# Altium PCB PIC18F16Q20_Curiosity_Nano.PcbDoc (part 2 of 2)
Units mm, origin at the board's own origin, x right, y up, seen from the top; angles counter-clockwise.
Board outline 50.8 x 20.32 mm, 4 copper layers (Top Layer, Gnd Plane, Pwr Plane, Bottom Layer), stack 1.574 mm thick; 77 components, 73 nets, 345 pads, 157 vias.
Unrouted connection lines stored in the file: 1.
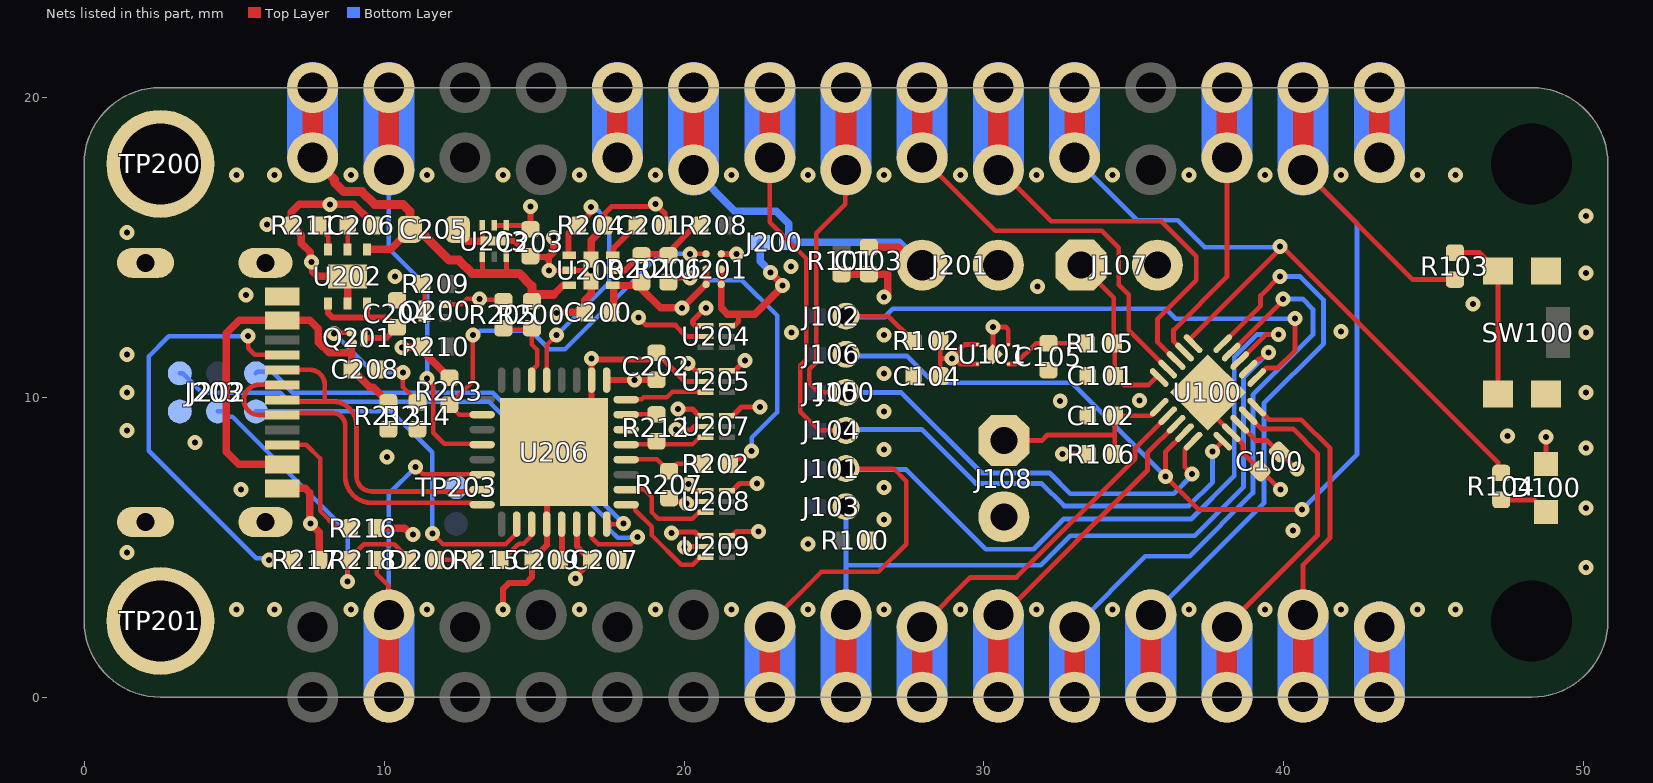
[diagram p4: the nets of this part, all layers, seen from the top]

## Via types
v1: diameter 0.5, hole 0.2, Top Layer to Bottom Layer, 147 vias
v2: diameter 0.5, hole 0.2, Top Layer to Bottom Layer, tented both sides, 8 vias
v3: diameter 0.5, hole 0.2, Top Layer to Bottom Layer, tented top, 2 vias

## Nets (pads, with @x,y where several pads share a name; then routed paths per layer and width w, separated by ;. In a path a pad name is that pad's centre, name@x,y a point inside that pad or via, vN(x,y) a via of type N, cw(c..) or ccw(c..) an arc to the next point about the centre after c; other vN are vias at no path point) (continued)
GND: C100.2 C101.2 C102.2 C103.1 C104.1 C105.1 C200.1 C201.2 C202.1 C203.1 C204.1 C205.1 C206.1 C207.2 C209.1 J100.15 J100.16 J100.26 J107.2 J108.2 J202.2 J203.1 J203.2 J203.3 J203.4 J203.A1/B12 J203.B1/A12 Q200.2 R100.2 R101.2 R203.2 R204.2 R205.1 R206.1 R207.1 R210.2 R211.2 R213.2 R214.2 R216.2 R217.2 SW100.1 SW100.2 TP200.1 TP201.1 TP203.1 U100.17 U100.21 U101.2 U101.5 U200.2 U200.7 U201.C1 U202.5 U202.7 U203.3 U203.7 U204.2 U205.2 U206.10 U206.28 U206.33 U207.2 U208.2 U209.2 | length 60
  Top Layer w0.15: Q200.2@12.04,13.1 12.575,13.1 12.75,13.275 v1(13.19,13.275) 13.215,13.25 R205.1@13.979,13.25
  Top Layer w0.16: U101.5@30.297,11.433 v1@30.297,12.325 ; v1(30.306,12.342) 30.717,12.342 30.81,12.248 U101.2@30.81,11.758 ; U100.21@37.465,10.16 37.465,9.594 38.63,8.429 38.63,8.154 39.86,6.924 v1(39.889,6.924)
  Top Layer w0.166: v1(18.48,12.65) 18.73,12.4 19.71,12.4 20.085,12.025 U204.2@20.729,12.025 ; C202.1@19.058,11.5 20.033,10.525 U205.2@20.729,10.525 ; v1(19.734,8.925) 19.759,8.9 19.804,8.9 20.217,8.9 20.343,9.025 U207.2@20.729,9.025 ; v1@20.13,5.025 U209.2@20.729,5.025 ; v1@20.155,6.525 U208.2@20.729,6.525
  Top Layer w0.175: U203.3@13.279,15.725 13.279,15.2 U203.7@13.679,15.2 ; v1(15.505,14.225) U200.2@16.18,14.225 v1(16.905,14.225) ; R204.2@17.355,15.725 17.355,16.122 17.59,16.357 18.89,16.357 18.969,16.436 v1(19.057,16.436) 19.355,16.138 C201.2@19.355,15.725 ; R206.1@19.48,13.775 19.68,13.975 v1(20.199,13.975) ; R207.1@19.555,6.525 19.559,6.521 19.861,6.521 19.932,6.45 v1(20.08,6.45) v1@20.155,6.525 ; v1(20.023,4.998) 20.103,4.998 v1@20.13,5.025 ; v1@20.089,5.025 v1@20.13,5.025 ; v1@20.125,5.02 v1@20.13,5.025
  Top Layer w0.2: U203.7@13.679,15.2 14.354,15.2 14.879,14.675 15.38,14.675 15.505,14.55 ; v1(13.97,2.921) 13.97,3.615 14.155,3.8 14.732,3.8 14.93,3.998 14.93,4.575 15.424,5.069 15.424,7.909 U206.33@15.679,8.164 ; v1(15.505,14.225) 15.505,14.55 ; 15.505,14.705 15.505,14.55 ; U206.33@15.689,8.174 16.916,9.401 16.916,11.112 17.063,11.259 18.817,11.259 C202.1@19.058,11.5 ; U201.C1@21.242,14.775 v1(21.755,14.775)
  Top Layer w0.25: J203.A1/B12@6.39,13.36 J203.A1/B12@6.665,13.36 ; J203.B1/A12@6.665,6.96 7.368,6.96 7.515,6.814 7.515,5.821 7.844,5.493 R217.2@7.844,4.575 ; U202.5@8.785,13.128 U202.7@8.785,14.028 7.784,14.028 7.627,14.186 7.627,14.452 7.535,14.544 7.535,14.84 7.246,15.128 7.246,15.393 7.081,15.558 7.062,15.558 6.913,15.707 6.913,16.168 7.172,16.426 v1(8.19,16.426) 8.192,16.424 8.986,16.424 9.518,15.892 9.536,15.892 9.685,15.743 C206.1@9.685,15.725 ; R216.2@9.752,5.633 10.684,5.633 10.892,5.425 v2(10.96,5.425) ; v1(10.599,11.649) 10.617,11.667 11.248,11.667 R210.2@11.265,11.684 11.407,11.542 11.407,11.412 12.008,10.811 12.008,10.793 12.157,10.644 R203.2@12.175,10.644 ; C205.1@12.356,15.597 12.754,15.2 U203.7@13.279,15.2 ; 15.505,14.705 15.655,14.855 v1(15.655,15.325) ; v1(15.755,12.8) 15.782,12.827 C200.1@16.695,12.827 16.695,13.233 16.905,13.443 v1(16.905,14.225) 16.905,15.225 R204.2@17.405,15.725 ; R101.2@25.248,14.104 C103.1@26.162,14.104 26.794,14.104 26.794,13.459 v1(26.67,13.335)
  other v1: 5.08,2.921 6.35,2.921 8.89,2.921 11.43,2.921 16.51,2.921 19.05,2.921 21.59,2.921 24.13,2.921 26.67,2.921 29.21,2.921 31.75,2.921 34.29,2.921 36.83,2.921 39.37,2.921 41.91,2.921 44.45,2.921 45.72,2.921 50.065,4.321 1.429,4.826 24.141,5.102 40.304,5.559 7.544,5.792 26.67,5.915 50.065,6.306 26.67,6.985 26.67,8.255 50.065,8.3 47.45,8.701 1.429,8.89 26.67,9.525 32.543,9.871 35.179,9.882 1.429,10.16 50.065,10.15 26.67,10.795 16.913,11.284 1.429,11.43 26.67,12.065 23.58,12.152 50.065,12.15 41.9,12.192 46.3,13.113 5.39,13.413 31.78,13.694 10.366,14.025 50.065,14.133 23.565,14.353 7.579,14.5 1.429,15.494 6.1,15.755 50.065,16.045 5.08,17.399 6.35,17.399 8.89,17.399 11.43,17.399 13.97,17.399 16.51,17.399 19.05,17.399 21.59,17.399 24.13,17.399 26.67,17.399 29.21,17.399 31.75,17.399 34.29,17.399 36.83,17.399 39.37,17.399 41.91,17.399 44.45,17.399 45.72,17.399
  other v2: 5.235,6.924 10.093,8.006 3.701,8.493
ID_SYS: J100.2 R218.1 U206.22 | length 9.6
  Top Layer w0.15: R218.1@9.748,4.513 9.748,4.114 10.16,3.703 J100.2@10.16,2.743 ; v1(11.055,7.675) 11.306,7.424 U206.22@13.28,7.424
  Bottom Layer w0.15: J100.2@10.16,2.743 10.16,6.78 v1(11.055,7.675)
NetC201_1: C201.1 U200.6 | length 1.3
  Top Layer w0.2: U200.6@17.655,14.725 17.655,14.975 C201.1@18.405,15.725
NetC206_2: C206.2 U202.2 | length 0.8
  Top Layer w0.15: U202.2@8.785,14.899 C206.2@8.785,15.725
NetC208_1: C208.1 Q201.1 R214.1 | length 5.5
  Top Layer w0.15: v2(8.338,12.122) 8.366,12.15 Q201.1@8.927,12.15 ; C208.1@9.818,10.931 10.431,10.931 10.536,10.825 v2(10.631,10.825) 10.631,10.339 R214.1@11.145,9.825
  Bottom Layer w0.15: v2(8.338,12.122) 9.635,10.825 v2(10.631,10.825)
NetD100_2: D100.2 R104.2 | length 1.7
  Top Layer w0.16: R104.2@47.244,6.573 48.342,6.573 D100.2@48.74,6.175
NetD200_2: D200.2 R215.1 | length 1.3
  Top Layer w0.15: D200.2@11.715,4.575 R215.1@12.98,4.575
NetJ203_A5: J203.A5 R217.1 | length 14.7
  Top Layer w0.15: v2(5.468,12.035) 5.468,11.634 5.691,11.41 J203.A5@6.665,11.41 ; v2(6.165,4.575) R217.1@6.944,4.575
  Bottom Layer w0.15: v2(5.468,12.035) 2.827,12.035 2.15,11.358 2.15,8.219 5.737,4.632 6.108,4.632 v2(6.165,4.575)
NetJ203_B5: J203.B5 R216.1 | length 4.4
  Top Layer w0.15: J203.B5@6.665,8.41 7.411,8.41 7.865,7.956 7.865,6.208 8.44,5.633 R216.1@8.852,5.633
NetQ200_3: Q200.3 R209.1 | length 1
  Top Layer w0.15: R209.1@11.214,13.7 11.355,13.559 Q200.3@11.355,12.8
NetR103_2: R103.2 SW100.3 SW100.4 | length 5.8
  Top Layer w0.16: R103.2@45.7,14.821 46.519,14.821 46.72,14.62 46.72,14.57 47.09,14.2 SW100.4@47.14,14.2 SW100.3@47.14,10.1
NetR211_1: R211.1 U202.3 | length 0.9
  Top Layer w0.15: R211.1@7.813,15.725 7.813,15.666 8.135,15.344 U202.3@8.135,14.912
RA0_ANA0_ICSPDAT: J100.24 J104.2 U100.16 | length 26
  Top Layer w0.15: J100.24@22.86,17.983 22.86,15.836 24.075,14.621 24.075,11.251 23.88,11.056 23.88,9.518 24.508,8.89 J104.2@25.4,8.89
  Top Layer w0.16: v1(37.619,8.193) U100.16@37.96,8.534
  Bottom Layer w0.16: J104.2@25.4,8.89 25.434,8.924 27.921,8.924 29.72,7.125 31.917,7.125 32.669,6.373 34.816,6.373 34.82,6.377 36.83,6.377 37.619,7.166 v1(37.619,8.193)
RA1_ANA1_ICSPCLK: J100.23 J105.2 U100.15 | length 23.5
  Top Layer w0.15: J105.2@25.4,10.16 24.487,10.16 24.18,10.467 24.18,10.932 24.403,11.155 24.403,15.463 25.375,16.434 25.375,17.551 J100.23@25.4,17.577
  Top Layer w0.16: v1(36.935,7.432) 36.692,7.675 36.692,8.256 U100.15@36.97,8.534
  Bottom Layer w0.16: J105.2@25.4,10.16 25.407,10.153 27.24,10.153 29.921,7.472 32.19,7.472 32.881,6.781 34.034,6.781 36.321,6.781 36.935,7.395 v1(36.935,7.432)
RA2_ANA2_DBG2_SW0_INT0: J100.17 J106.2 R103.1 U100.14 | length 38.5
  Top Layer w0.16: v1(36.048,7.359) 37.147,6.26 v1(40.604,6.26) ; v1@36.051,7.359 36.051,8.18 U100.14@36.687,8.816 ; J100.17@40.64,17.577 44.296,13.921 R103.1@45.7,13.921
  Bottom Layer w0.16: J106.2@25.4,11.43 25.455,11.375 27.432,11.375 28.328,10.478 32.929,10.478 v1(36.048,7.359) ; v1(40.604,6.26) 42.436,8.092 42.436,15.78 J100.17@40.64,17.577
RA3_M\C\L\R\: J102.2 R102.1 U100.1 | length 20.5
  Top Layer w0.16: J102.2@25.4,12.7 26.814,12.7 R102.1@27.639,11.875 ; U100.1@39.091,10.655 39.409,10.972 39.798,10.972 40.373,11.547 v1(40.373,12.616)
  Bottom Layer w0.16: J102.2@25.4,12.7 25.431,12.669 26.683,12.669 26.964,12.95 36.052,12.95 36.387,12.616 v1(40.373,12.616)
RA4_SPI_SS: J100.14 U100.20 | length 8.9
  Top Layer w0.16: U100.20@39.091,9.665 39.506,9.25 40.579,9.25 41.537,8.293 41.537,5.309 40.64,4.413 J100.14@40.64,2.743
RA5_SPI_SCK: J100.13 U100.19 | length 9.9
  Top Layer w0.16: J100.13@38.1,2.337 38.1,2.371 41.117,5.389 41.117,8.127 40.304,8.94 39.251,8.94 U100.19@38.809,9.382
RB5_I3C2_SDA: J100.22 U100.9 | length 12.5
  Top Layer w0.16: J100.22@27.94,17.983 30.377,15.546 33.926,15.546 34.496,14.977 34.496,13.742 34.829,13.409 34.829,12.23 U100.9@36.121,10.938
RB6_I3C2_SCL: J100.21 U100.8 | length 12.1
  Top Layer w0.16: J100.21@30.48,17.577 30.527,17.577 32.237,15.867 35.91,15.867 37.077,14.7 37.077,13.898 35.782,12.602 35.782,11.843 U100.8@36.404,11.221
RB7_ANB7: J100.18 U100.7 | length 7.4
  Top Layer w0.16: U100.7@36.687,11.504 36.323,11.868 36.323,12.238 38.1,14.015 J100.18@38.1,18
RC0_I2C_I3C1_SCL: J100.10 U100.13 | length 8.9
  Top Layer w0.16: J100.10@30.48,2.743 30.637,2.743 35.45,7.556 35.45,8.145 U100.13@36.404,9.099
RC1_I2C_I3C1_SDA: J100.9 U100.12 | length 11.3
  Top Layer w0.16: J100.9@27.94,2.337 27.94,2.385 29.548,3.993 31.082,3.993 35.039,7.95 35.039,8.299 U100.12@36.121,9.382
RC3_SPI_MOSI: J100.11 U100.4 | length 18.4
  Top Layer w0.16: U100.4@38.243,11.504 39.976,13.237 v1(39.976,13.274)
  Bottom Layer w0.16: J100.11@33.02,2.337 35.379,4.696 36.854,4.696 38.966,6.807 38.966,10.08 40.965,12.08 40.965,12.932 40.623,13.274 v1(39.976,13.274)
RC4_UART_TX: J100.7 J101.2 U100.3 | length 32.5
  Top Layer w0.15: J100.7@22.86,2.337 22.86,2.461 24.572,4.173 26.479,4.173 27.404,5.099 27.404,7.202 26.986,7.62 J101.2@25.4,7.62 J101.2@25.41,7.61
  Top Layer w0.16: U100.3@38.526,11.221 39.394,12.089 v1(39.817,12.089)
  Bottom Layer w0.16: J101.2@25.4,7.62 25.427,7.593 27.399,7.593 30.059,4.932 31.65,4.932 32.657,5.939 36.911,5.939 38.346,7.374 38.346,11.337 39.097,12.089 v1(39.817,12.089)
RC5_UART_RX: J100.8 J103.2 U100.2 | length 23.7
  Top Layer w0.16: U100.2@38.809,10.938 39.154,11.284 39.234,11.284 39.444,11.494 v1(39.491,11.494)
  Bottom Layer w0.16: J100.8@25.4,2.743 25.4,4.4 ; J103.2@25.4,6.35 25.4,4.4 ; v1(39.491,11.494) 38.656,10.659 38.656,7.01 37.028,5.383 32.874,5.383 31.891,4.4 25.4,4.4
RC6_SPI_MISO: J100.12 U100.5 | length 17.7
  Top Layer w0.16: U100.5@37.96,11.786 39.222,13.048 39.222,13.385 v1(39.864,14.028)
  Bottom Layer w0.16: J100.12@35.56,2.743 35.606,2.743 39.332,6.469 39.332,9.793 41.323,11.784 41.323,13.236 40.531,14.028 v1(39.864,14.028)
RC7_ANC7_LED0_PWM: J100.20 R104.1 U100.6 | length 23.3
  Top Layer w0.16: U100.6@36.97,11.786 36.856,11.9 36.856,11.926 39.876,14.946 v1(39.876,15.02) 39.943,15.02 47.135,7.828 47.135,7.582 R104.1@47.244,7.473
  Bottom Layer w0.16: J100.20@33.02,17.983 35.106,15.897 36.457,15.897 37.354,15 39.856,15 v1(39.876,15.02)
REG_ADJUST: R201.2 R206.2 R208.1 U200.5 | length 3.4
  Top Layer w0.2: U200.5@17.655,14.225 18.03,14.225 18.58,14.775 19.505,14.775 19.505,14.85 R208.1@20.38,15.725
REG_ENABLE: R204.1 U200.1 U206.13 | length 8.9
  Top Layer w0.15: U206.13@15.416,10.556 15.416,11.736 v1(15.755,12.075)
  Top Layer w0.2: U200.1@16.155,14.725 16.155,15.475 16.405,15.725 R204.1@16.373,15.725 ; R204.1@16.455,15.725 16.455,15.73 16.65,15.925 16.655,15.925 16.848,16.118 16.848,16.275 v1(16.905,16.333)
  Bottom Layer w0.15: v1(15.755,12.075) 17.506,13.826 17.506,15.853 17.151,16.207 17.125,16.207 17,16.333 v1(16.905,16.333)
RESERVED: U206.6
S0_0_RX: R212.1 U206.5 U207.3 | length 2.8
  Top Layer w0.15: U206.5@18.06,8.424 20.28,8.424 20.531,8.675 U207.3@20.729,8.675
S0_2_TX: R212.2 U206.7 | length 1
  Top Layer w0.15: U206.7@18.06,9.424 R212.2@19.055,9.424
S0_3_CLK: U205.3 U206.8 | length 2.8
  Top Layer w0.15: U206.8@18.06,9.937 18.595,9.937 18.659,10 19.43,10 19.605,10.175 U205.3@20.729,10.175
S1_0_TX: U206.1 U209.3 | length 3.9
  Top Layer w0.15: U206.1@18.07,6.42 18.33,6.42 18.376,6.374 18.376,6.231 18.93,5.677 18.93,5.389 19.906,4.413 20.291,4.413 20.554,4.675 U209.3@20.729,4.675
S1_1_RX: U206.2 U208.3 | length 3.5
  Top Layer w0.15: U206.2@18.06,6.924 18.666,6.924 18.93,6.66 18.93,6.156 19.136,5.95 20.28,5.95 20.505,6.175 U208.3@20.729,6.175
S\R\S\T\: J202.6 U206.26 | length 12.5
  Top Layer w0.15: v3(11.609,5.458) 11.967,5.1 13.102,5.1 14.05,5.1 14.465,5.515 14.465,5.55 14.47,5.555 U206.26@14.47,5.695
  Bottom Layer w0.15: J202.6@5.73,9.525 10.245,9.524 11.609,8.16 v3(11.609,5.458)
STATUS_LED: R215.2 U206.27 | length 1.7
  Top Layer w0.15: R215.2@13.93,4.575 13.955,4.575 14.455,5.075 14.5,5.12 14.66,5.12 14.765,5.225 14.933,5.393 U206.27@14.933,5.777
SWCLK: J202.1 U206.31 | length 19.9
  Top Layer w0.15: U206.31@16.924,5.787 16.924,5.316 17.14,5.1 18.224,5.1 v1(18.455,5.331)
  Bottom Layer w0.15: J202.1@3.19,10.795 3.285,10.795 3.93,10.15 6.536,10.15 6.833,9.853 13.496,9.853 17.514,5.835 17.514,5.587 17.792,5.309 18.433,5.309 v1(18.455,5.331)
SWDIO: J202.5 U206.32 | length 14.9
  Top Layer w0.15: U206.32@17.42,5.77 17.975,5.77 v1(17.989,5.784)
  Bottom Layer w0.15: J202.5@5.73,10.795 5.778,10.843 6.267,10.843 6.958,10.153 13.62,10.153 v1(17.989,5.784)
USBD_N: J203.A7 J203.B7 U206.23 | length 13
  Top Layer w0.16: J203.B7@6.665,10.91 6.669,10.914 7.523,10.914 ; U206.23@13.27,6.92 12.946,6.92 12.886,6.86 9.59,6.86 ; J203.A7@6.725,9.85 cw(c6.725,9.91) 6.665,9.91 ccw(c6.725,9.91) J203.A7@6.725,9.85 ; J203.A7@6.725,9.85 8.025,9.85 ; 7.522,10.914 cw(c7.522,10.414) 8.022,10.414 ; 7.522,10.914 cw(c7.522,10.414) 8.022,10.414 ; 8.022,10.414 8.022,9.852 8.025,9.85 ; 8.025,9.85 8.296,9.85 cw(c8.296,9.063) 9.083,9.063 9.083,7.366 ; 9.083,7.366 ccw(c9.59,7.366) 9.59,6.86 ; 9.083,7.366 ccw(c9.59,7.366) 9.59,6.86
USBD_P: J203.A6 J203.B6 U206.24 | length 15.3
  Top Layer w0.16: 5.327,9.912 cw(c5.827,9.912) 5.827,10.412 J203.A6@6.665,10.412 ; U206.24@13.27,6.42 12.946,6.42 12.886,6.48 9.59,6.48 ; 5.827,9.408 cw(c5.827,9.908) 5.327,9.908 ccw(c5.827,9.908) 5.827,9.408 ; 5.827,9.408 6.665,9.408 J203.B6@6.665,9.41 ; J203.B6@6.665,9.41 cw(c6.725,9.41) J203.B6@6.725,9.47 ; J203.B6@6.665,9.41 cw(c6.725,9.41) J203.B6@6.725,9.47 ; J203.B6@6.725,9.47 8.296,9.47 ; 8.296,9.47 cw(c8.296,9.063) 8.703,9.063 ; 8.296,9.47 cw(c8.296,9.063) 8.703,9.063 ; 8.703,7.366 ccw(c9.59,7.366) 9.59,6.48 ; 8.703,7.366 ccw(c9.59,7.366) 9.59,6.48 ; 8.703,7.366 8.703,9.063
V\O\F\F\: J100.29 U206.20 | length 11.2
  Top Layer w0.15: v1(11.433,10.628) 11.433,10.573 11.635,10.371 11.635,8.815 12.003,8.447 12.873,8.447 12.88,8.439 13.251,8.439 U206.20@13.27,8.42
  Bottom Layer w0.15: J100.29@10.16,17.577 10.16,14.958 11.433,13.686 v1(11.433,10.628)
VBUS: C208.2 J203.A4/B9 J203.B4/A9 Q201.2 R213.1 | length 13.6
  Top Layer w0.2: 8.927,11.475 Q201.2@8.927,11.715
  Top Layer w0.25: J203.B4/A9@6.675,7.76 6.665,7.76 5.16,7.76 4.74,8.18 4.74,12.131 5.169,12.56 6.665,12.56 7.528,12.56 7.813,12.275 7.813,11.832 8.171,11.475 8.927,11.475 C208.2@8.927,10.94 ; C208.2@8.918,10.931 8.918,10.912 9.067,10.763 9.085,10.763 9.523,10.325 9.644,10.325 9.976,9.992 9.976,9.974 10.121,9.829 R213.1@10.139,9.829
VBUS_ADC: R200.2 R205.2 U206.14 | length 2.8
  Top Layer w0.15: R205.2@13.979,12.25 14.916,12.25 14.916,11.764 15.105,11.575 15.105,11.068 14.916,10.879 U206.14@14.916,10.556
VBUS_DELAYED: C204.2 Q201.3 U202.4 U202.6 | length 4.5
  Top Layer w0.2: U202.4@8.135,13.128 8.135,13.054 8.135,12.803 8.286,12.652 10.108,12.652 10.266,12.494 10.266,12.476 C204.2@10.415,12.327 ; Q201.3@9.41,11.975 10.082,11.975 10.266,12.16 10.266,12.178 C204.2@10.415,12.327 ; U202.6@9.435,13.128 9.435,12.669 9.437,12.667 ; C204.2@10.434,12.327 C204.2@10.415,12.327
VCC_EDGE: C103.2 J100.25 J200.2 J201.1 | length 11.5
  Top Layer w0.25: C103.2@26.162,15.004 27.163,15.004 27.766,14.402 J201.1@27.94,14.402 ; J201.1@27.786,14.402 J201.1@27.94,14.402
  Bottom Layer w0.25: J100.25@20.32,17.577 21.694,16.203 23.074,16.203 23.49,15.787 J200.2@23.49,15.162 27.18,15.162 J201.1@27.94,14.402
VCC_LEVEL: J200.1 U201.A1 U201.B1 U204.6 U205.6 U207.6 U208.6 U209.6 | length 10.5
  Top Layer w0.175: U209.6@21.429,5.375 21.605,5.375 21.755,5.525 v1(22.48,5.525) ; U208.6@21.429,6.875 21.605,6.875 21.855,7.125 v1(22.43,7.125) ; U207.6@21.429,9.375 21.442,9.388 21.627,9.388 21.915,9.675 v1(22.53,9.675) ; U205.6@21.429,10.875 21.68,10.875 v1(22.03,11.225) ; U204.6@21.429,12.375 21.442,12.388 21.677,12.388 21.815,12.525 21.815,12.767
  Top Layer w0.2: U201.A1@21.242,13.775 U201.B1@21.242,14.267
  Top Layer w0.225: 21.242,12.963 U201.A1@21.242,13.759 U201.A1@21.242,13.775
  Top Layer w0.25: 21.254,12.963 21.449,12.767 21.815,12.767 22.362,12.767 23.29,13.695 v1(23.29,13.725) 23.29,13.745 v1(22.876,14.159)
  Bottom Layer w0.25: J200.1@22.54,15.162 22.54,14.525 22.876,14.189 v1(22.876,14.159)
VCC_MCU_CORE: C209.2 U206.29 | length 1.2
  Top Layer w0.2: C209.2@15.88,4.575 15.924,4.619 U206.29@15.924,5.787
VCC_P3V3: C202.2 C203.2 C207.1 D200.1 J202.4 R218.2 U203.1 U203.2 U204.1 U205.1 U206.9 U206.30 U207.1 U208.1 U209.1 | length 21.8
  Top Layer w0.15: v1(8.785,3.855) 8.785,4.511 R218.2@8.848,4.575 8.848,4.625 9.323,5.1 10.34,5.1 10.815,4.625 D200.1@10.815,4.575
  Top Layer w0.175: U203.2@13.679,15.725 14.779,15.725 C203.2@14.879,15.625 ; v1(19.581,5.475) 19.613,5.507 20.363,5.507 20.483,5.388 20.717,5.388 20.729,5.375 U209.1@20.508,5.375 ; v1(19.804,9.6) 20.28,9.6 20.505,9.375 U207.1@20.729,9.375 ; v1(20.139,11.125) 20.389,10.875 U205.1@20.729,10.875 ; v1(20.155,7.1) 20.38,6.875 U208.1@20.729,6.875 ; U204.1@20.729,12.375 20.383,12.375 20.28,12.478 20.28,12.541 20.712,12.973 v1(20.729,12.973)
  Top Layer w0.2: C203.2@14.879,15.6 v1(14.879,16.357) ; v1(16.375,3.95) 16.375,4.009 16.905,4.539 C207.1@16.905,4.575 ; U206.30@16.424,5.787 16.424,5.031 C207.1@16.88,4.575 ; U206.9@17.416,10.581 v1(18.355,10.581) 18.969,10.581 C202.2@19.055,10.495
  Bottom Layer w0.15: J202.4@4.46,9.525 4.636,9.525 4.813,9.348 4.946,9.348 8.786,5.508 v1(8.785,3.855)
VCC_REGULATOR: C200.2 R201.1 R202.2 U200.4 U201.A2 U201.B2 | length 23.7
  Top Layer w0.175: R202.2@21.579,7.875 21.653,7.95 22.005,7.95 v1(22.255,8.2) ; v1@22.305,8.175 v1@22.33,8.2
  Top Layer w0.2: R201.1@18.58,13.62 R201.1@18.58,13.775 ; U201.A2@20.742,13.775 U201.B2@20.742,14.275
  Top Layer w0.225: v1(19.94,12.973) U201.A2@20.742,13.775
  Top Layer w0.24: C200.2@17.655,13.02 17.655,13.725 18.53,13.725 R201.1@18.58,13.775
  Top Layer w0.25: R201.1@18.58,13.62 19.227,12.973 v1(19.94,12.973)
  Bottom Layer w0.15: 20.867,13.9 21.927,13.9 ; 20.867,13.9 21.927,13.9 ; 20.867,13.9 v1(19.94,12.973) 20.867,13.9 ; 21.927,13.9 23.105,12.722 ; 21.927,13.9 23.105,12.722 ; 22.255,8.654 v1(22.255,8.2) 22.255,8.654 ; 22.255,8.654 23.105,9.504 ; 22.255,8.654 23.105,9.504 ; 23.105,9.504 23.105,12.722 ; 23.105,9.504 23.105,12.722
VCC_TARGET: C100.1 C104.2 D100.1 J201.2 R102.2 R106.2 U100.18 U101.3 U101.4 | length 7.9
  Top Layer w0.159: C100.1@39.817,8.175 C100.1@39.84,8.175
  Top Layer w0.16: R102.2@28.539,11.875 28.539,11.29 ; C104.2@28.555,10.701 28.539,10.716 28.539,11.29 ; U101.4@29.784,11.108 29.195,11.108 29.013,11.29 v1(28.931,11.29) ; U101.3@29.784,11.758 29.354,11.758 29.02,11.423 29.02,11.339 29.069,11.29 v1(28.931,11.29) ; v1(32.618,8.105) R106.2@33.458,8.105 ; U100.18@38.526,9.099 39.073,8.552 39.44,8.552 C100.1@39.817,8.175 ; C100.1@39.84,8.175 40.388,7.628 v1@40.388,7.618 ; D100.1@48.74,7.775 v1(48.74,8.671) ; 28.539,11.29 v1(28.931,11.29)
  other v1: 40.432,7.61
VCC_VBUS: C205.2 J100.30 R200.1 U200.3 U202.1 U203.4 U203.6 | length 14
  Top Layer w0.175: 13.279,14.151 U203.4@13.279,14.675 ; 14.079,14.151 U203.6@14.079,14.675
  Top Layer w0.24: 15.655,13.425 15.955,13.725 U200.3@16.155,13.725
  Top Layer w0.25: U202.1@9.455,14.928 10.218,14.928 C205.2@10.858,15.569
  Top Layer w0.3: J100.30@7.62,17.983 8.34,17.263 8.34,17.171 8.662,16.849 9.26,16.849 9.683,16.426 10.629,16.426 10.858,16.197 C205.2@10.858,15.597 10.909,15.546 11.067,15.388 11.358,15.388 12.175,14.571 12.493,14.571 12.939,14.125 14.504,14.125 14.929,13.7 R200.1@14.929,13.425 ; R200.1@14.929,13.25 R200.1@14.929,13.425 ; 15.655,13.425 R200.1@14.929,13.425
VCC_VDDIO3_P1V2: C105.2 R105.2 U101.1 | length 2.9
  Top Layer w0.16: U101.1@30.81,11.108 31.05,11.108 31.742,11.8 C105.2@32.149,11.8 33.426,11.8 R105.2@33.429,11.797
VDDIO2: C102.1 J108.1 R106.1 U100.11 | length 6.6
  Top Layer w0.16: J108.1@30.663,8.552 31.929,8.552 32.116,8.739 34.358,8.739 ; R106.1@34.358,8.105 34.358,8.739 ; U100.11@35.839,9.665 35.556,9.382 C102.1@34.367,9.382 34.358,9.374 34.358,8.739
VDDIO3: C101.1 J107.1 R105.1 U100.10 | length 5.9
  Top Layer w0.16: J107.1@33.242,14.402 34.329,13.314 R105.1@34.329,11.797 34.358,11.768 C101.1@34.358,10.713 34.669,10.401 35.477,10.401 35.772,10.696 35.798,10.696 U100.10@35.839,10.655
VTG_ADC: R202.1 R207.2 U206.4 | length 2.7
  Top Layer w0.15: U206.4@18.06,7.924 19.11,7.924 R207.2@19.505,7.529 ; R207.2@19.543,7.561 19.756,7.775 R202.1@20.579,7.775
VTG_EN: R203.1 U201.C2 U206.18 | length 13.3
  Top Layer w0.15: v1(12.965,12.075) 12.965,10.534 R203.1@12.175,9.744 12.499,9.42 U206.18@13.27,9.42 ; v1(20.199,14.775) U201.C2@20.742,14.775
  Bottom Layer w0.15: v1(12.965,12.075) 13.06,12.075 13.195,12.211 14.894,12.211 15.505,11.6 16.03,11.6 19.205,14.775 v1(20.199,14.775)
pads on no net: J100.1 J100.19 J202.3 J203.0 J203.A8 J203.B8 Q200.0 Q201.0 SW100.5 U202.0 U203.5

## Polygon pours and split planes (outlines as drawn)
GND on Bottom Layer "Bottom Layer-GND" (solid, remove dead copper, pour order 1): 83.82,20.32 83.82,0 0,0 0,20.32
GND on Top Layer "Top Layer-GND" (solid, remove dead copper, pour order 0): 50.8,20.32 50.8,0 0,0 0,20.32
VCC_P3V3 on Pwr Plane (split plane): 2.54,19.81 21.461,19.81 21.461,14.6 21.461,4.95 21.461,0.51 2.54,0.51 2.524,0.509 2.341,0.518 2.144,0.547 1.95,0.596 1.762,0.663 1.582,0.748 1.411,0.851 1.251,0.969 1.103,1.103 0.969,1.251 0.851,1.411 0.748,1.582 0.663,1.762 0.596,1.95 0.547,2.144 0.518,2.341 0.509,2.524 0.51,2.54 0.51,17.78 0.509,17.796 0.518,17.979 0.547,18.176 0.596,18.37 0.663,18.558 0.748,18.738 0.851,18.909 0.969,19.069 1.103,19.217 1.251,19.351 1.411,19.469 1.582,19.572 1.762,19.657 1.95,19.724 2.144,19.773 2.341,19.802 2.524,19.811
VCC_TARGET on Pwr Plane (split plane): 48.459,19.802 48.656,19.773 48.85,19.724 49.038,19.657 49.218,19.572 49.389,19.469 49.549,19.351 49.697,19.217 49.831,19.069 49.949,18.909 50.052,18.738 50.137,18.558 50.204,18.37 50.253,18.176 50.282,17.979 50.291,17.796 50.29,17.78 50.29,2.54 50.291,2.524 50.282,2.341 50.253,2.144 50.204,1.95 50.137,1.762 50.052,1.582 49.949,1.411 49.831,1.251 49.697,1.103 49.549,0.969 49.389,0.851 49.218,0.748 49.038,0.663 48.85,0.596 48.656,0.547 48.459,0.518 48.276,0.509 48.26,0.51 21.719,0.51 21.719,4.821 24.255,4.821 24.305,4.83 24.347,4.858 24.375,4.9 24.384,4.95 24.384,14.6 24.375,14.65 24.347,14.692 24.305,14.72 24.255,14.729 21.719,14.729 21.719,19.81 48.26,19.81 48.276,19.811
VCC_LEVEL on Pwr Plane (split plane): 24.126,5.079 21.719,5.079 21.719,14.47 24.126,14.47
GND on Gnd Plane (split plane): 48.459,19.802 48.656,19.773 48.85,19.724 49.038,19.657 49.218,19.572 49.389,19.469 49.549,19.351 49.697,19.217 49.831,19.069 49.949,18.909 50.052,18.738 50.137,18.558 50.204,18.37 50.253,18.176 50.282,17.979 50.291,17.796 50.29,17.78 50.29,2.54 50.291,2.524 50.282,2.341 50.253,2.144 50.204,1.95 50.137,1.762 50.052,1.582 49.949,1.411 49.831,1.251 49.697,1.103 49.549,0.969 49.389,0.851 49.218,0.748 49.038,0.663 48.85,0.596 48.656,0.547 48.459,0.518 48.276,0.509 48.26,0.51 2.54,0.51 2.524,0.509 2.341,0.518 2.144,0.547 1.95,0.596 1.762,0.663 1.582,0.748 1.411,0.851 1.251,0.969 1.103,1.103 0.969,1.251 0.851,1.411 0.748,1.582 0.663,1.762 0.596,1.95 0.547,2.144 0.518,2.341 0.509,2.524 0.51,2.54 0.51,17.78 0.509,17.796 0.518,17.979 0.547,18.176 0.596,18.37 0.663,18.558 0.748,18.738 0.851,18.909 0.969,19.069 1.103,19.217 1.251,19.351 1.411,19.469 1.582,19.572 1.762,19.657 1.95,19.724 2.144,19.773 2.341,19.802 2.524,19.811 2.54,19.81 48.26,19.81 48.276,19.811

## Keep-outs
Bottom Layer:
  rectangle: 27.94,13.552 30.48,15.252
  region: 23.655,14.69 23.655,15.666 22.282,15.666 22.282,14.69
Keep-Out Layer:
  text "'.Layer_Name'" at 174.01,-104.74 h1.5

## Other copper
Top Layer:
  pour cut-out: 29.463,10.783 31.126,10.783 31.126,12.083 29.462,12.083
  region net GND: 19.741,6.67 19.768,6.697 19.798,6.702 19.809,6.678 19.821,6.662 19.835,6.642 19.845,6.632 19.863,6.618 19.886,6.613 19.901,6.616 19.912,6.604 19.916,6.584 19.881,6.538 19.756,6.522 19.711,6.568
  region net VTG_ADC: 19.795,7.658 19.774,7.712 19.88,7.706 19.853,7.699 19.831,7.69 19.813,7.675
  region net GND: 18.724,11.343 18.794,11.413 18.825,11.343
  text ".ProjectPCBFabRevision" at 209.188,-104.562 h1.5
  text "'.Layer_Name'" at 174.01,-104.74 h1.5
Bottom Layer:
  pour cut-out: 25.99,13.356 25.99,5.694 23.875,5.694 23.875,13.356
  region net DBG0: 24.332,8.448 24.403,8.578 24.543,8.578 24.643,8.448
  text ".ProjectPCBFabRevision" at 209.188,-104.562 h1.5
  text ".ProjectPCBFabRevision" at 209.188,-104.562 h1.5
  text ".ProjectPCBFabRevision" at 209.188,-104.562 h1.5
  text "'.Layer_Name'" at 174.01,-104.74 h1.5
Pwr Plane (plane layer: these items are gaps in the copper):
  lines w0.254: 21.59,0.016 21.59,4.95 ; 21.59,20.32 21.59,14.6 ; 21.59,4.95 21.59,14.6 ; 21.59,4.95 24.255,4.95 24.255,14.6 21.59,14.6

## Silkscreen, mask and mechanical layers (free items; w line width, h text height)
Top Overlay:
  lines w0.15: 6.699,3.989 21.364,3.989 ; 6.699,16.306 21.391,16.306 ; 17.525,16.75 18.025,16.75 ; 18.975,16.75 19.475,16.75 ; 19.225,16.5 19.225,17 ; 28.863,6.01 29.363,6.01 ; 28.863,8.54 29.363,8.54 ; 29.113,8.29 29.113,8.79 ; 33.042,12.736 33.542,12.736 ; 33.292,12.486 33.292,12.986 ; 35.563,12.684 36.063,12.684
  text "GND" at 5.497,16.58 h0.9 r90
  text "RA0" at 21.905,16.086 h0.75
  text "RB5" at 26.968,15.972 h0.75
  text "RC7" at 32.045,15.972 h0.75
  text "RB7" at 37.125,15.972 h0.75
  text "GND" at 42.205,15.972 h0.75
  text "RA1" at 24.55,15.693 h0.75
  text "RB6" at 29.508,15.693 h0.75
  text "NC" at 34.96,15.693 h0.75
  text "RA2" at 39.665,15.693 h0.75
  text "RA2" at 46.965,15.208 h0.75
  text "VDDIO3" at 37.366,14.25 h0.75
  text "POWER" at 27.551,12.452 h0.75
  text "SW0" at 46.05,11.185 h0.75 r90
  text "1.2V" at 29.211,9.92 h0.7
  text "DEBUGGER" at 8.35,6.697 h0.75 r90
  text "PIC® / MCU" at 40.64,6.561 h2.2
  text "c" at 40.067,6.423 h8
  text "LED0" at 46.05,5.476 h0.75 r90
  text "'.ProjectTargetName'" at 33.175,5.2 h0.9
  text "PS" at 10.66,5.175 h0.75
  text "VDDIO2" at 28.479,5.122 h0.75 r90
  text "'.ProjectTargetName' / CURIOSITY NANO" at 24.63,4.802 h1.35 r90
  text "RC7" at 46.965,4.405 h0.75
  text "RC5" at 24.425,3.912 h0.75
  text "RC0" at 29.508,3.912 h0.75
  text "RC6" at 34.585,3.912 h0.75
  text "RA4" at 39.665,3.912 h0.75
  text "RC4" at 21.885,3.609 h0.75
  text "RC1" at 27.093,3.609 h0.75
  text "RC3" at 32.045,3.609 h0.75
  text "RA5" at 37.125,3.609 h0.75
  text "GND" at 42.205,3.609 h0.75
  text "GND" at 5.497,1.34 h0.9 r90
  text ".ProjectPCBFabRevision" at 209.188,-104.562 h1.5
  text "'.Layer_Name'" at 174.01,-104.74 h1.5
Bottom Overlay:
  lines w0.15: 23.815,5.625 23.815,13.42 ; 26.115,5.625 26.115,13.42 ; 27.365,13.42 26.115,13.42 20.54,13.42 20.54,5.625 29.165,5.625 29.165,13.42 28.515,13.42
  lines w0.2: 31.1,9.9 31.3,9.9 31.2,10 ; 31.3,11.15 31.3,10.2 31,9.9 31,10.2 31.2,10 ; 31.7,13.574 32,13.874 32,13.574 31.8,13.774 ; 31.9,13.874 31.7,13.874 31.8,13.774 ; 31.2,10 31.2,10 ; 31.8,13.774 31.8,13.774
  text "GND" at 5.497,18.98 h0.9 r90
  text "VBUS" at 8.375,16.025 h0.75
  text "D3" at 13.325,15.972 h0.75
  text "GND" at 18.78,15.972 h0.75
  text "RA0" at 23.86,15.947 h0.75
  text "RB5" at 28.94,15.947 h0.75
  text "RC7" at 34.02,15.947 h0.75
  text "RB7" at 39.1,15.947 h0.75
  text "GND" at 44.18,15.947 h0.75
  text "VOFF" at 11.535,15.693 h0.75
  text "D0" at 15.865,15.693 h0.75
  text "VTG" at 21.32,15.693 h0.75
  text "RA1" at 26.275,15.668 h0.75
  text "RB6" at 31.48,15.668 h0.75
  text "NC" at 36.185,15.668 h0.75
  text "RA2" at 41.64,15.668 h0.75
  text "CONNECTIONS" at 26.711,13.774 h0.7
  text "'.ProjectPCBFabNumber' Rev'.ProjectPCBFabRevision'" at 50.2,13.686 h2
  text "TARGET" at 30.2,13.5 h0.7 r90
  text "VDDIO3" at 35.164,12.45 h0.75
  text "DEBUGGER" at 20.205,12.397 h0.75 r90
  text "D3" at 23.485,12.335 h0.75
  text "RA3" at 28.684,12.33 h0.75
  text "VDDIO2" at 35.143,11.4 h0.75
  text "Microchip © 2023" at 50.5,11.15 h2
  text "D2" at 23.485,11.06 h0.75
  text "RA2" at 28.672,11.054 h0.75
  text "C" at 19.2,10.8 h9.7
  text "" at 12.911,10.48 h5 r90
  text "4" at 12.356,10.467 h5
  text "D1" at 23.485,9.785 h0.75
  text "RA1" at 28.672,9.779 h0.75
  text "D0" at 23.485,8.51 h0.75
  text "RA0" at 28.672,8.504 h0.75
  text "CDC" at 21.719,7.985 h0.75 r90
  text "RX" at 23.485,7.235 h0.75
  text "RC4" at 28.672,7.229 h0.75
  text "GND" at 11.5,6.655 h0.75
  text "TX" at 23.485,5.96 h0.75
  text "RC5" at 28.672,5.954 h0.75
  text "1" at 18.776,5.7 h5
  text "BOOT" at 11.5,5.41 h0.75
  text "CDC" at 14.955,4.825 h0.75
  text "ID" at 10.722,3.913 h0.75
  text "TX" at 15.865,3.913 h0.75
  text "D2" at 20.945,3.913 h0.75
  text "RC5" at 26.4,3.887 h0.75
  text "RC0" at 31.48,3.887 h0.75
  text "RC6" at 36.56,3.887 h0.75
  text "RA4" at 41.64,3.887 h0.75
  text "GND" at 5.497,3.74 h0.9 r90
  text "RC4" at 23.86,3.584 h0.75
  text "RC1" at 28.815,3.584 h0.75
  text "RC3" at 34.02,3.584 h0.75
  text "RA5" at 39.1,3.584 h0.75
  text "GND" at 44.18,3.584 h0.75
  text "NC" at 8.245,3.534 h0.75
  text "RX" at 13.325,3.534 h0.75
  text "D1" at 18.28,3.534 h0.75
  text ".ProjectPCBFabRevision" at 209.188,-104.562 h1.5
  text "'.Layer_Name'" at 174.01,-104.74 h1.5
Top Paste:
  text ".ProjectPCBFabRevision" at 209.188,-104.562 h1.5
  text "'.Layer_Name'" at 174.01,-104.74 h1.5
Bottom Paste:
  text ".ProjectPCBFabRevision" at 209.188,-104.562 h1.5
  text "'.Layer_Name'" at 174.01,-104.74 h1.5
Top Solder:
  text ".ProjectPCBFabRevision" at 209.188,-104.562 h1.5
  text "'.Layer_Name'" at 174.01,-104.74 h1.5
Bottom Solder:
  text ".ProjectPCBFabRevision" at 209.188,-104.562 h1.5
  text "'.Layer_Name'" at 174.01,-104.74 h1.5
NOTES (M1):
  lines w0.1: -2.5,-2.5 53.3,-2.5 53.3,22.82 -2.5,22.82 -2.5,-2.5
  text "'.Layer_Name'" at 192.01,-104.74 h1.5
BOARD (M2):
  the board outline again, w0.1
  text ".ProjectPCBFabRevision" at 209.188,-104.562 h1.5
  text "'.Layer_Name'" at 174.01,-104.74 h1.5
REF POINTS (M3):
  text "'.Layer_Name'" at 174.01,-104.74 h1.5
FAB (M4):
  text ".ProjectPCBFabRevision" at 209.188,-104.562 h1.5
  text "'.Layer_Name'" at 174.01,-104.74 h1.5
Case (M5):
  text "'.Layer_Name'" at 174.01,-104.74 h1.5
Cover (M6):
  text "'.Layer_Name'" at 174.01,-104.74 h1.5
Terminal Block (M7):
  text "'.Layer_Name'" at 174.01,-104.74 h1.5
Route Tool Path:
  text "'.Layer_Name'" at 174.01,-104.74 h1.5
V-Cut (M9):
  text "'.Layer_Name'" at 174.01,-104.74 h1.5
Bottom Assembly:
  text "'.VariantName'" at -76.44,-88.74 h0.9
  text "ASSEMBLY VARIANT:" at -62.19,-88.74 h0.9
  text "DOCUMENT NUMBER:" at -108.44,-96.99 h1.15
  text "'.ProjectPCBAssyNumber'_ASSY-D" at -108.69,-99.99 h1.38
  text ".ProjectPCBAssyRevision" at -125.368,-104.562 h1.5
  text "'.Layer_Name'" at -90.49,-104.74 h1
Top Assembly:
  text "ASSEMBLY VARIANT:" at 146.01,-88.74 h0.9
  text "'.VariantName'" at 160.26,-88.74 h0.9
  text "DOCUMENT NUMBER:" at 192.26,-96.99 h1.15
  text "'.ProjectPCBAssyNumber'_ASSY-D" at 192.51,-99.99 h1.38
  text ".ProjectPCBAssyRevision" at 209.188,-104.562 h1.5
  text "'.Layer_Name'" at 174.01,-104.74 h1
Bottom 3D Body:
  text "'.Layer_Name'" at 174.01,-104.74 h1.15
Top 3D Body:
  text "'.Layer_Name'" at 174.01,-104.74 h1.2
Bottom Courtyard:
  text ".ProjectPCBFabRevision" at 209.188,-104.562 h1.5
  text "'.Layer_Name'" at 174.01,-104.74 h1
Top Courtyard:
  text ".ProjectPCBFabRevision" at 209.188,-104.562 h1.5
  text "'.Layer_Name'" at 174.01,-104.74 h1.1
TITLE (M16):
  lines w0.1: 145.51,-87.49 227.33,-87.49 ; 197.51,-79.99 197.51,-82.99 227.33,-82.99 ; 216.05,-104.625 216.05,-103.355 ; 216.05,-103.99 226.21,-103.99 ; 216.21,-102.79 216.21,-101.79 ; 216.21,-102.29 226.21,-102.29 ; 218.59,-104.625 218.59,-103.355 ; 221.13,-104.625 221.13,-103.355 ; 221.21,-102.59 221.21,-101.99 ; 223.67,-104.625 223.67,-103.355 ; 226.21,-104.625 226.21,-103.355 ; 226.21,-102.79 226.21,-101.79 ; 227.33,-82.99 227.33,-82.99
  lines w0.127: -148.59,-50.165 -143.51,-50.165 ; -148.59,10.16 -143.51,10.16 ; -148.59,70.485 -143.51,70.485 ; -85.09,-110.49 -85.09,-105.41 ; -85.09,125.73 -85.09,130.81 ; -21.59,-110.49 -21.59,-105.41 ; -21.59,125.73 -21.59,130.81 ; 41.91,-110.49 41.91,-105.41 ; 41.91,125.73 41.91,130.81 ; 77.47,-105.41 113.03,-105.41 ; 105.41,-110.49 105.41,-105.41 ; 105.41,125.73 105.41,130.81 ; 145.51,-105.41 145.51,-79.99 ; 145.51,-100.99 227.33,-100.99 ; 145.51,-94.99 227.33,-94.99 ; 145.51,-88.99 227.33,-88.99 ; 168.91,-110.49 168.91,-105.41 ; 168.91,125.73 168.91,130.81 ; 173.51,-105.41 173.51,-88.99 ; 191.51,-100.99 191.51,-94.99 ; 204.51,-105.41 204.51,-100.99 ; 212.01,-105.41 212.01,-94.99 ; 227.33,-74.93 227.33,-105.41 ; 227.33,-50.165 232.41,-50.165 ; 227.33,10.16 232.41,10.16 ; 227.33,70.485 232.41,70.485 ; 227.33,-105.41 227.33,-79.99 111.51,-79.99 111.51,-105.41 227.33,-105.41 ; 227.33,-105.41 -143.51,-105.41 -143.51,125.73 227.33,125.73 227.33,-105.41 ; -148.59,-110.49 232.41,-110.49 232.41,130.81 -148.59,130.81 -148.59,-110.49
  lines w0.254: 116.83,116.73 116.83,121.23 116.83,125.73 ; 129.33,116.73 129.33,121.23 129.33,125.73 ; 207.83,116.73 207.83,121.23 207.83,125.73 ; 227.33,121.23 105.83,121.23 ; 105.83,121.23 105.83,125.73 227.33,125.73 227.33,116.73 105.83,116.73 105.83,121.23
  text "1" at -117.314,127.508 h1.78
  text "2" at -53.924,127.508 h1.78
  text "3" at 9.305,127.508 h1.78
  text "4" at 72.974,127.508 h1.78
  text "5" at 136.449,127.508 h1.78
  text "6" at 200.076,127.508 h1.78
  text "REV" at 108.33,122.73 h1.52
  text "ECO" at 118.33,122.73 h1.52
  text "Comments" at 164.83,122.23 h1.52
  text "Date" at 212.83,122.23 h1.52
  text "A" at -146.685,98.476 h1.78
  text "A" at 229.235,98.476 h1.78
  text "B" at -146.685,38.024 h1.78
  text "B" at 229.235,38.024 h1.78
  text "C" at -146.685,-22.301 h1.78
  text "C" at 229.235,-22.301 h1.78
  text "PART NUMBER:" at 198.51,-81.99 h1
  text "'.ProjectpartNumber'" at 210.51,-82.24 h1.5
  text "D" at -146.685,-82.499 h1.78
  text "TITLE:" at 146.51,-82.49 h1.14
  text "D" at 229.235,-82.499 h1.78
  text "'.ProjectTitle'" at 146.51,-86.49 h2.5
  text "PCB Layout Contact:" at 146.51,-90.99 h1.15
  text "GERBER FILE:" at 174.51,-90.99 h1.15
  text ".ProjectContactPCB" at 146.51,-93.99 h1.6
  text "'.Plot_File_Name'" at 174.51,-93.99 h1.5
  text "M" at 114.51,-95.99 h15.24
  text "Project Owner:" at 146.51,-96.99 h1.15
  text "BOARD NUMBER:" at 174.51,-96.99 h1.15
  text "DATE:" at 213.21,-96.99 h1.14
  text "Microchip Technology Inc." at 113.28,-99.25 h1.78
  text ".ProjectContactOwner" at 146.51,-99.99 h1.6
  text ".ProjectPCBFabNumber" at 174.51,-99.99 h1.6
  text "'.PRINT_DATE'" at 213.21,-99.99 h1.5
  text "2355 W. Chandler Blvd." at 114.51,-101.99 h1.78
  text "LAYER NAME:" at 174.51,-102.49 h1.14
  text "10mm" at 212.51,-102.59 h0.7
  text "PCB FILE NAME:" at 146.51,-102.74 h1.15
  text "REV:" at 205.26,-102.74 h1.14
  text "400mil" at 212.41,-104.29 h0.7
  text "Chandler, AZ  85224" at 115.51,-104.49 h1.78
  text "'.PCB_FILE_NAME_NO_PATH'" at 146.51,-104.74 h1
  text "1" at -117.314,-108.712 h1.78
  text "2" at -53.924,-108.712 h1.78
  text "3" at 9.305,-108.712 h1.78
  text "4" at 72.974,-108.712 h1.78
  text "5" at 136.449,-108.712 h1.78
  text "6" at 200.076,-108.712 h1.78
Drill Drawing:
  text "DOCUMENT NUMBER:" at 192.26,-96.99 h1.15
  text "'.ProjectPCBFabNumber'_FAB-D" at 192.51,-99.99 h1.38
  text ".ProjectPCBFabRevision" at 209.188,-104.562 h1.5
TITLE MIRROR (M17):
  lines w0.1: -143.51,-87.49 -61.69,-87.49 ; -142.39,-104.625 -142.39,-103.355 ; -142.39,-103.99 -132.23,-103.99 ; -142.39,-102.79 -142.39,-101.79 ; -142.39,-102.29 -132.39,-102.29 ; -139.85,-104.625 -139.85,-103.355 ; -137.39,-102.59 -137.39,-101.99 ; -137.31,-104.625 -137.31,-103.355 ; -134.77,-104.625 -134.77,-103.355 ; -132.39,-102.79 -132.39,-101.79 ; -132.23,-104.625 -132.23,-103.355 ; -113.69,-79.99 -113.69,-82.99 -143.51,-82.99 ; -143.51,-82.99 -143.51,-82.99
  lines w0.127: -148.59,-50.165 -143.51,-50.165 ; -148.59,10.16 -143.51,10.16 ; -148.59,70.485 -143.51,70.485 ; -143.51,-100.99 -61.69,-100.99 ; -143.51,-94.99 -61.69,-94.99 ; -143.51,-88.99 -61.69,-88.99 ; -128.19,-105.41 -128.19,-94.99 ; -120.69,-105.41 -120.69,-100.99 ; -107.69,-100.99 -107.69,-94.99 ; -89.69,-105.41 -89.69,-88.99 ; -85.09,-110.49 -85.09,-105.41 ; -85.09,125.73 -85.09,130.81 ; -61.69,-105.41 -61.69,-79.99 ; -21.59,-110.49 -21.59,-105.41 ; -21.59,125.73 -21.59,130.81 ; 41.91,-110.49 41.91,-105.41 ; 41.91,125.73 41.91,130.81 ; 105.41,-110.49 105.41,-105.41 ; 105.41,125.73 105.41,130.81 ; 168.91,-110.49 168.91,-105.41 ; 168.91,125.73 168.91,130.81 ; 227.33,-50.165 232.41,-50.165 ; 227.33,10.16 232.41,10.16 ; 227.33,70.485 232.41,70.485 ; -143.51,-105.41 227.33,-105.41 227.33,125.73 -143.51,125.73 -143.51,-105.41 ; -143.51,-105.41 -27.69,-105.41 -27.69,-79.99 -143.51,-79.99 -143.51,-105.41 ; -148.59,-110.49 232.41,-110.49 232.41,130.81 -148.59,130.81 -148.59,-110.49
  lines w0.254: -143.51,121.23 -22.01,121.23 ; -124.01,116.73 -124.01,121.23 -124.01,125.73 ; -45.51,116.73 -45.51,121.23 -45.51,125.73 ; -33.01,116.73 -33.01,121.23 -33.01,125.73 ; -22.01,121.23 -22.01,125.73 -143.51,125.73 -143.51,116.73 -22.01,116.73 -22.01,121.23
  text "6" at -116.256,127.508 h1.78
  text "5" at -52.629,127.508 h1.78
  text "4" at 10.846,127.508 h1.78
  text "3" at 74.515,127.508 h1.78
  text "2" at 137.744,127.508 h1.78
  text "1" at 201.134,127.508 h1.78
  text "ECO" at -34.51,122.73 h1.52
  text "REV" at -24.51,122.73 h1.52
  text "Date" at -129.01,122.23 h1.52
  text "Comments" at -81.01,122.23 h1.52
  text "A" at -145.415,98.476 h1.78
  text "A" at 230.505,98.476 h1.78
  text "B" at -145.415,38.024 h1.78
  text "B" at 230.505,38.024 h1.78
  text "C" at -145.415,-22.301 h1.78
  text "C" at 230.505,-22.301 h1.78
  text "PART NUMBER:" at -114.69,-81.99 h1
  text "'.ProjectpartNumber'" at -126.69,-82.24 h1.5
  text "D" at -145.415,-82.499 h1.78
  text "TITLE:" at -62.69,-82.49 h1.14
  text "D" at 230.505,-82.499 h1.78
  text "'.ProjectTitle'" at -62.69,-86.49 h2.5
  text "GERBER FILE:" at -90.69,-90.99 h1.15
  text "PCB Layout Contact:" at -62.69,-90.99 h1.15
  text "'.Plot_File_Name'" at -90.69,-93.99 h1.5
  text ".ProjectContactPCB" at -62.69,-93.99 h1.6
  text "M" at -30.69,-95.99 h15.24
  text "DATE:" at -129.39,-96.99 h1.14
  text "BOARD NUMBER:" at -90.69,-96.99 h1.15
  text "Project Owner:" at -62.69,-96.99 h1.15
  text "Microchip Technology Inc." at -29.46,-99.25 h1.78
  text "'.PRINT_DATE'" at -129.39,-99.99 h1.5
  text ".ProjectPCBAssyNumber" at -90.69,-99.99 h1.6
  text ".ProjectContactOwner" at -62.69,-99.99 h1.6
  text "2355 W. Chandler Blvd." at -30.69,-101.99 h1.78
  text "LAYER NAME:" at -90.69,-102.49 h1.14
  text "10mm" at -128.69,-102.59 h0.7
  text "REV:" at -121.44,-102.74 h1.14
  text "PCB FILE NAME:" at -62.69,-102.74 h1.15
  text "400mil" at -128.59,-104.29 h0.7
  text "Chandler, AZ  85224" at -31.69,-104.49 h1.78
  text "'.PCB_FILE_NAME_NO_PATH'" at -62.69,-104.74 h1
  text "6" at -116.256,-108.712 h1.78
  text "5" at -52.629,-108.712 h1.78
  text "4" at 10.846,-108.712 h1.78
  text "3" at 74.515,-108.712 h1.78
  text "2" at 137.744,-108.712 h1.78
  text "1" at 201.134,-108.712 h1.78

## Dimensions
2.54,0 to 2.54,2.54 on Drill Drawing
0,2.54 to 2.54,2.54 on Drill Drawing

## Text inside footprints (layer, text, board x,y; h text height)
J100: Top Assembly "1" at 6.073,0.968 h0.4
SW100: Top Assembly "1" at 48.49,14.275 h0.4 r270
U100: Top Assembly "1" at 39.25,10.39 h0.4 r135
U101: Top Assembly "1" at 30.703,11.053 h0.15 r90
U200: Top Assembly "1" at 16.325,14.575 h0.3
U204: Top Assembly "1" at 20.679,12.125 h0.3
U205: Top Assembly "1" at 20.679,10.625 h0.3
U207: Top Assembly "1" at 20.679,9.125 h0.3
U208: Top Assembly "1" at 20.679,6.625 h0.3
U209: Top Assembly "1" at 20.679,5.125 h0.3